# Altium PCB PCB.PcbDoc (part 2 of 4)
Units mm, origin at the board's own origin, x right, y up, seen from the top; angles counter-clockwise.
Board outline 38 x 42 mm, 4 copper layers (Top Layer, Inner GND 1, Inner GND 2, Bottom Layer), stack 1.62 mm thick; 195 components, 172 nets, 763 pads, 474 vias.
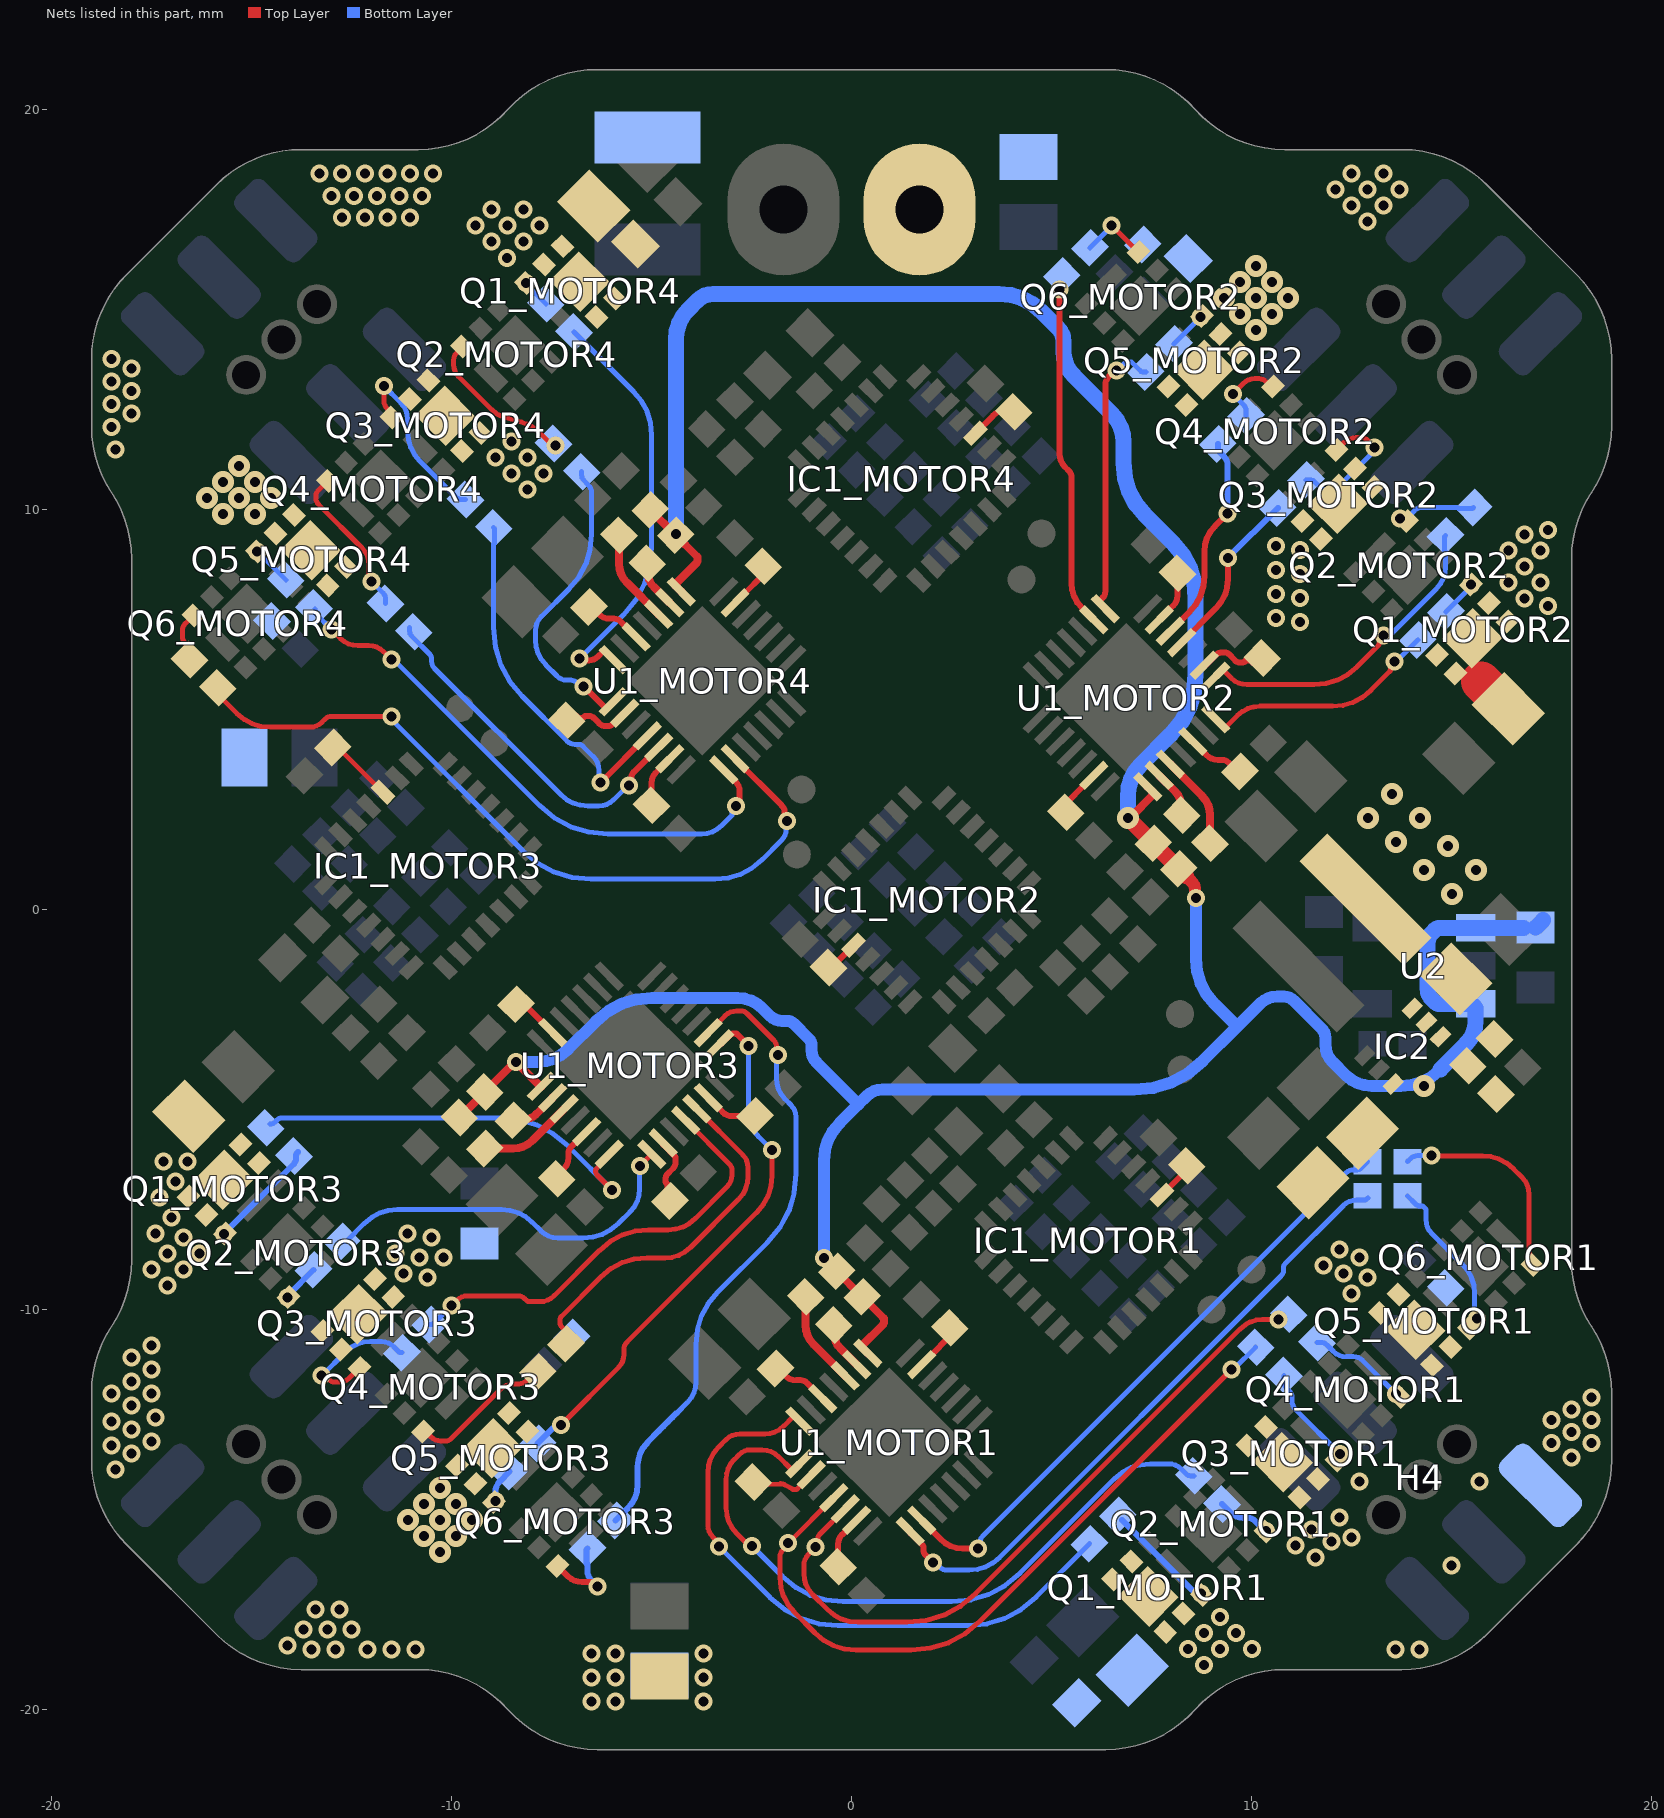
[diagram p4: the nets of this part, all layers, seen from the top]

## Via types
v1: diameter 0.45, hole 0.25, Top Layer to Bottom Layer, tented both sides, 381 vias
v2: diameter 0.55, hole 0.25, Top Layer to Bottom Layer, tented both sides, 93 vias

## Nets (pads, with @x,y where several pads share a name; then routed paths per layer and width w, separated by ;. In a path a pad name is that pad's centre, name@x,y a point inside that pad or via, vN(x,y) a via of type N, cw(c..) or ccw(c..) an arc to the next point about the centre after c; other vN are vias at no path point) (continued)
+5V: C3_MOTOR1.2 C3_MOTOR2.2 C3_MOTOR3.2 C3_MOTOR4.2 C4_MOTOR1.2 C4_MOTOR2.2 C4_MOTOR3.2 C4_MOTOR4.2 C17.2 C18.2 C19.2 IC2.6 R22.2 U1_MOTOR1.1 U1_MOTOR2.1 U1_MOTOR3.1 U1_MOTOR4.1 U2.1 U2.3 | length 83.6
  Top Layer w0.15: v1@8.599,0.301 v1(8.609,0.291)
  Top Layer w0.2: C3_MOTOR3.2@-9.805,-5.198 C4_MOTOR3.2@-9.177,-4.57 ; C4_MOTOR3.2@-9.169,-4.561 -8.424,-3.817 -8.42,-3.814 -8.415,-3.811 -8.41,-3.809 -8.405,-3.809 -8.397,-3.809 -8.394,-3.809 v1(-8.391,-3.809) -8.389,-3.811 -8.387,-3.813 -7.773,-4.427 -7.77,-4.429 -7.767,-4.43 -7.764,-4.429 -7.761,-4.427 U1_MOTOR3.1@-7.754,-4.42 ; C3_MOTOR4.2@-5.036,9.998 C4_MOTOR4.2@-4.411,9.373 ; C4_MOTOR4.2@-4.409,9.371 -4.408,9.37 C4_MOTOR4.2@-4.408,9.353 ; C4_MOTOR4.2@-4.399,9.361 -3.873,8.835 -3.863,8.824 -3.857,8.811 -3.852,8.797 -3.851,8.782 -3.851,8.745 -3.854,8.718 -3.861,8.693 -3.873,8.67 -3.891,8.649 -4.401,8.139 -4.404,8.135 -4.406,8.132 -4.407,8.128 -4.408,8.124 -4.408,8.113 -4.407,8.105 -4.405,8.098 -4.401,8.092 -4.396,8.086 U1_MOTOR4.1@-4.258,7.947 ; C3_MOTOR1.2@-0.371,-9.043 0.251,-9.665 0.253,-9.668 0.255,-9.671 0.256,-9.675 0.256,-9.678 C4_MOTOR1.2@0.256,-9.688 ; C4_MOTOR1.2@0.265,-9.679 0.791,-10.206 0.801,-10.217 0.808,-10.23 0.812,-10.243 0.813,-10.258 0.813,-10.296 0.811,-10.323 0.803,-10.347 0.791,-10.37 0.774,-10.391 0.263,-10.902 0.26,-10.905 0.258,-10.909 0.257,-10.913 0.256,-10.917 0.256,-10.928 0.257,-10.935 0.259,-10.942 0.263,-10.949 0.268,-10.955 U1_MOTOR1.1@0.406,-11.094 ; v2@6.997,2.328 7.542,2.873 7.547,2.879 7.551,2.886 7.553,2.893 7.554,2.901 7.554,2.911 7.553,2.916 7.552,2.919 7.55,2.923 7.547,2.926 U1_MOTOR2.1@7.404,3.07 ; C4_MOTOR2.2@7.554,1.655 C4_MOTOR2.2@7.554,1.665
  Top Layer w0.3: C3_MOTOR2.2@8.366,0.835 8.499,0.702 8.539,0.653 8.568,0.6 8.585,0.542 8.591,0.479 8.591,0.32 8.592,0.315 8.593,0.31 8.596,0.305 v1@8.599,0.301
  Top Layer w0.4: v2@6.997,2.204 C4_MOTOR2.2@7.545,1.656 ; C4_MOTOR2.2@7.554,1.655 7.554,1.651 7.555,1.648 7.557,1.645 7.559,1.642 7.997,1.204 8.089,1.112 C3_MOTOR2.2@8.181,1.019 8.274,0.927 C3_MOTOR2.2@8.366,0.835
  Bottom Layer w0.3: v1(-8.391,-3.809) -7.85,-3.809 -7.636,-3.789 -7.439,-3.731 -7.258,-3.633 -7.093,-3.496 -6.387,-2.789 -6.082,-2.536 -5.748,-2.355 -5.384,-2.247 -4.991,-2.211 -2.852,-2.211 -2.677,-2.227 -2.516,-2.275 -2.368,-2.355 -2.233,-2.467 -2.047,-2.653 -1.98,-2.708 -1.907,-2.748 -1.827,-2.772 -1.74,-2.78 -1.619,-2.78 -1.571,-2.784 -1.527,-2.797 -1.487,-2.819 -1.45,-2.85 -1.07,-3.23 -1.039,-3.267 -1.018,-3.307 -1.004,-3.351 -1,-3.399 -1,-3.52 -0.992,-3.607 -0.968,-3.687 -0.928,-3.76 -0.873,-3.827 0.17,-4.87 ; v1(-0.691,-8.709) -0.691,-6.279 -0.667,-6.015 -0.594,-5.771 -0.473,-5.547 -0.304,-5.343 0.17,-4.87 ; v1(8.609,0.291) 8.609,-1.236 8.638,-1.552 8.725,-1.844 8.87,-2.112 9.073,-2.357 9.64,-2.924 ; 14.724,-3.994 14.506,-4.176 14.266,-4.305 14.005,-4.383 13.723,-4.409 13.006,-4.409 12.822,-4.392 12.652,-4.341 12.496,-4.257 12.354,-4.139 12.024,-3.809 11.945,-3.715 11.889,-3.611 11.856,-3.499 11.845,-3.377 11.845,-3.206 11.838,-3.139 11.82,-3.077 11.789,-3.021 11.746,-2.969 11.05,-2.273 10.999,-2.23 10.942,-2.199 10.88,-2.181 10.813,-2.174 10.642,-2.174 10.521,-2.186 10.408,-2.219 10.305,-2.275 10.21,-2.353 9.64,-2.924 ; 0.17,-4.87 0.373,-4.666 0.461,-4.594 0.557,-4.542 0.662,-4.51 0.775,-4.5 7.064,-4.5 7.546,-4.456 7.991,-4.323 8.399,-4.102 8.771,-3.793 9.64,-2.924
  Bottom Layer w0.4: v2(-4.391,9.391) -4.391,14.246 -4.371,14.46 -4.312,14.658 -4.214,14.84 -4.076,15.006 -3.864,15.218 -3.773,15.294 -3.673,15.348 -3.564,15.38 -3.446,15.391 3.678,15.391 3.982,15.363 4.263,15.28 4.52,15.14 4.755,14.945 5.16,14.54 5.221,14.466 5.265,14.386 5.291,14.297 5.3,14.202 5.3,13.96 5.316,13.787 5.364,13.626 5.443,13.479 5.555,13.345 6.502,12.398 6.633,12.241 6.726,12.069 6.781,11.882 6.8,11.679 6.8,11.165 6.834,10.797 6.935,10.456 7.104,10.144 7.341,9.859 8.035,9.165 8.283,8.867 8.46,8.539 8.567,8.182 8.602,7.795 8.602,5.868 8.564,5.448 8.448,5.059 8.255,4.703 7.985,4.378 7.231,3.624 7.09,3.455 6.989,3.269 6.929,3.066 6.909,2.847 v2(6.909,2.291) ; 14.724,-3.994 15.364,-3.354 15.469,-3.228 15.544,-3.089 15.589,-2.938 15.604,-2.774 15.604,-2.546 15.592,-2.464 15.557,-2.406 15.499,-2.371 15.417,-2.359 14.716,-2.359 14.677,-2.355 14.64,-2.344 14.607,-2.326 14.576,-2.301 14.505,-2.23 14.459,-2.175 14.426,-2.114 14.407,-2.047 14.4,-1.976 14.4,-0.842 14.407,-0.771 14.426,-0.704 14.459,-0.643 14.505,-0.588 14.576,-0.517 14.607,-0.492 14.64,-0.473 14.677,-0.463 14.716,-0.459 15.6,-0.459 15.602,-0.459 U2.1@15.604,-0.459 U2.1@15.604,-0.459 15.607,-0.462 U2.1@15.608,-0.463 ; U2.1@15.612,-0.465 C17.2@16.8,-0.465 ; C17.2@17.101,-0.45 C17.2@17.289,-0.262
  other v2: 14.309,-4.409
+VBAT: C10_MOTOR1.2 C10_MOTOR2.2 C10_MOTOR3.2 C10_MOTOR4.2 C11_MOTOR1.2 C11_MOTOR2.2 C11_MOTOR3.2 C11_MOTOR4.2 C12_MOTOR1.2 C12_MOTOR2.2 C12_MOTOR3.2 C12_MOTOR4.2 C13_MOTOR1.2 C13_MOTOR2.2 C13_MOTOR3.2 C13_MOTOR4.2 C15.2 C16.2 H1.2 H4.6 IC2.2 IC2.3 L1.2 Q1_MOTOR1.1 Q1_MOTOR1.2 Q1_MOTOR1.5 Q1_MOTOR1.6 Q1_MOTOR1.7 Q1_MOTOR2.1 Q1_MOTOR2.2 Q1_MOTOR2.5 Q1_MOTOR2.6 Q1_MOTOR2.7 Q1_MOTOR3.1 Q1_MOTOR3.2 Q1_MOTOR3.5 Q1_MOTOR3.6 Q1_MOTOR3.7 Q1_MOTOR4.1 Q1_MOTOR4.2 Q1_MOTOR4.5 Q1_MOTOR4.6 Q1_MOTOR4.7 Q3_MOTOR1.1 Q3_MOTOR1.2 Q3_MOTOR1.5 Q3_MOTOR1.6 Q3_MOTOR1.7 Q3_MOTOR2.1 Q3_MOTOR2.2 Q3_MOTOR2.5 Q3_MOTOR2.6 Q3_MOTOR2.7 Q3_MOTOR3.1 Q3_MOTOR3.2 Q3_MOTOR3.5 Q3_MOTOR3.6 Q3_MOTOR3.7 Q3_MOTOR4.1 Q3_MOTOR4.2 Q3_MOTOR4.5 Q3_MOTOR4.6 Q3_MOTOR4.7 Q5_MOTOR1.1 Q5_MOTOR1.2 Q5_MOTOR1.5 Q5_MOTOR1.6 Q5_MOTOR1.7 Q5_MOTOR2.1 Q5_MOTOR2.2 Q5_MOTOR2.5 Q5_MOTOR2.6 Q5_MOTOR2.7 Q5_MOTOR3.1 Q5_MOTOR3.2 Q5_MOTOR3.5 Q5_MOTOR3.6 Q5_MOTOR3.7 Q5_MOTOR4.1 Q5_MOTOR4.2 Q5_MOTOR4.5 Q5_MOTOR4.6 Q5_MOTOR4.7 | length 1
  Top Layer w1: 15.737,5.7 C10_MOTOR2.2@16.419,5.019
  other v1: -6.5,-19.8 -5.9,-19.8 -3.7,-19.8 -6.5,-19.2 -5.9,-19.2 -3.7,-19.2 8.81,-18.884 -6.5,-18.6 -5.9,-18.6 -3.7,-18.6 -13.5,-18.5 -12.9,-18.5 -12.1,-18.5 -11.5,-18.5 -10.9,-18.5 8.41,-18.484 9.21,-18.484 10.01,-18.484 13.6,-18.5 14.2,-18.5 -14.1,-18.4 8.81,-18.084 9.61,-18.084 -13.7,-18 -13.1,-18 -12.5,-18 9.21,-17.684 -13.4,-17.5 -12.8,-17.5 15,-16.4 11.6,-16.2 11.1,-15.9 12,-15.8 12.5,-15.7 11.5,-15.5 12.2,-15.2 12.7,-14.3 15.7,-14.3 -18.4,-14 18,-13.7 -18,-13.6 -18.5,-13.4 17.5,-13.331 18.5,-13.331 -17.5,-13.3 18,-13.066 -18,-13 -18.5,-12.8 17.5,-12.766 18.5,-12.766 -17.4,-12.7 18,-12.5 -18,-12.4 18.5,-12.2 -18.5,-12.1 -17.5,-12.1 -18,-11.8 -17.5,-11.5 -18,-11.2 -17.5,-10.9 12.5,-9.6 -17.1,-9.4 -10.6,-9.2 12.9,-9.2 -11.2,-9.1 12.3,-9.1 -17.5,-9 -16.7,-9 11.8,-8.9 -10.8,-8.7 -10.2,-8.7 12.7,-8.7 -17.1,-8.6 -16.3,-8.6 -11.4,-8.6 12.2,-8.5 -16.7,-8.2 -10.5,-8.2 -17.4,-8.1 -11.1,-8.1 -17,-7.7 -17.3,-7.2 -16.9,-6.8 -17.2,-6.3 -16.6,-6.3 11.209,7.191 10.609,7.291 17.409,7.591 16.826,7.773 11.209,7.791 10.609,7.891 16.426,8.173 17.226,8.173 11.209,8.391 10.609,8.491 16.826,8.573 16.426,8.973 17.226,8.973 11.209,8.991 10.609,9.091 16.826,9.373 17.409,9.491 -8.1,10.5 -8.5,10.9 -7.7,10.9 -8.9,11.3 -8.1,11.3 -18.4,11.5 -8.5,11.7 -18.5,12.069 -18,12.4 -18.5,12.634 -18,12.966 -18.5,13.2 -18,13.531 -18.5,13.766 -8.609,16.291 -9,16.7 -8.2,16.7 -9.4,17.1 -8.6,17.1 -7.8,17.1 12.9,17.2 -12.734,17.3 -12.166,17.3 -11.6,17.3 -11.034,17.3 -9,17.5 -8.2,17.5 12.5,17.6 13.3,17.6 -13,17.834 -12.434,17.834 -11.866,17.834 -11.3,17.834 -10.734,17.834 12.1,18 12.9,18 13.7,18 -13.3,18.4 -12.734,18.4 -12.166,18.4 -11.6,18.4 -11.034,18.4 -10.469,18.4 12.5,18.4 13.3,18.4
  other v2: -10.29,-16.062 -10.69,-15.662 -9.89,-15.662 -11.09,-15.262 -10.29,-15.262 -9.49,-15.262 -10.69,-14.862 -9.89,-14.862 -10.29,-14.462 15.009,0.391 14.309,0.991 15.609,0.991 14.909,1.591 13.609,1.691 12.909,2.291 14.209,2.291 13.509,2.891 -15.709,9.891 -14.909,9.891 -16.109,10.291 -15.309,10.291 -14.509,10.291 -15.709,10.691 -14.909,10.691 -15.309,11.091 10.109,14.491 9.709,14.891 10.509,14.891 9.309,15.291 10.109,15.291 10.909,15.291 9.709,15.691 10.509,15.691 10.109,16.091
BSTA_MOTOR1: C5_MOTOR1.2 U1_MOTOR1.5 | length 1.5
  Top Layer w0.15: C5_MOTOR1.2@-1.901,-11.476 -1.866,-11.476 -1.852,-11.477 -1.839,-11.481 -1.827,-11.487 -1.817,-11.496 -1.661,-11.651 -1.601,-11.702 -1.534,-11.738 -1.461,-11.76 -1.383,-11.767 -1.273,-11.767 -1.229,-11.771 -1.189,-11.783 -1.153,-11.803 -1.119,-11.83 U1_MOTOR1.5@-0.725,-12.225
BSTA_MOTOR2: C5_MOTOR2.2 U1_MOTOR2.5 | length 1.5
  Top Layer w0.15: U1_MOTOR2.5@8.535,4.201 8.877,3.859 8.938,3.808 9.005,3.772 9.078,3.751 9.156,3.744 9.266,3.744 9.309,3.74 9.349,3.728 9.386,3.708 9.42,3.68 9.627,3.473 9.637,3.464 9.649,3.457 9.662,3.454 9.676,3.452 C5_MOTOR2.2@9.711,3.452
BSTA_MOTOR3: C5_MOTOR3.2 U1_MOTOR3.5 | length 1.5
  Top Layer w0.15: C5_MOTOR3.2@-7.372,-6.728 -7.372,-6.692 -7.371,-6.679 -7.367,-6.666 -7.361,-6.654 -7.352,-6.643 -7.197,-6.488 -7.146,-6.427 -7.11,-6.36 -7.088,-6.288 -7.081,-6.209 -7.081,-6.099 -7.077,-6.056 -7.065,-6.016 -7.045,-5.979 -7.018,-5.946 U1_MOTOR3.5@-6.623,-5.551
BSTA_MOTOR4: C5_MOTOR4.2 U1_MOTOR4.5 | length 1.5
  Top Layer w0.15: C5_MOTOR4.2@-6.565,7.565 -6.53,7.565 -6.516,7.564 -6.503,7.56 -6.492,7.553 -6.481,7.544 -6.326,7.389 -6.265,7.339 -6.198,7.303 -6.125,7.281 -6.047,7.274 -5.937,7.274 -5.894,7.27 -5.854,7.258 -5.817,7.238 -5.784,7.21 U1_MOTOR4.5@-5.389,6.816
BSTB_MOTOR1: C8_MOTOR1.2 U1_MOTOR1.9 | length 1.7
  Top Layer w0.125: C8_MOTOR1.2@-2.457,-14.311 ccw(c-2.275,-14.128) -2.275,-14.387 -2.116,-14.376 -1.784,-14.355 cw(c-1.771,-14.544) -1.771,-14.355 cw(c-1.771,-14.544) -1.679,-14.379 -1.665,-14.387 -1.485,-14.485 ccw(c-1.425,-14.375) -1.425,-14.5 -1.4,-14.5 ccw(c-1.4,-14.436) -1.355,-14.481 U1_MOTOR1.9@-1.008,-14.134
BSTB_MOTOR2: C8_MOTOR2.2 U1_MOTOR2.9 | length 1.8
  Top Layer w0.15: U1_MOTOR2.9@8.818,6.111 8.837,6.111 8.845,6.111 8.852,6.113 8.858,6.117 8.864,6.122 9.102,6.36 9.139,6.39 9.178,6.412 9.222,6.425 9.269,6.429 9.334,6.429 9.36,6.426 9.384,6.419 9.406,6.408 9.426,6.391 9.586,6.231 9.614,6.207 9.645,6.191 9.678,6.181 9.715,6.177 9.775,6.177 9.79,6.179 9.804,6.183 9.817,6.19 9.829,6.2 9.844,6.215 9.851,6.22 9.858,6.224 9.866,6.227 9.874,6.227 9.933,6.227 9.956,6.225 9.977,6.219 9.997,6.208 10.015,6.193 10.041,6.167 10.052,6.158 10.065,6.151 10.078,6.147 10.092,6.146 C8_MOTOR2.2@10.409,6.146
BSTB_MOTOR3: C8_MOTOR3.2 U1_MOTOR3.9 | length 1.8
  Top Layer w0.15: U1_MOTOR3.9@-4.714,-5.834 -4.714,-5.854 -4.713,-5.861 -4.711,-5.868 -4.708,-5.875 -4.703,-5.881 -4.434,-6.15 -4.417,-6.17 -4.405,-6.192 -4.398,-6.216 -4.396,-6.241 -4.396,-6.307 -4.4,-6.354 -4.413,-6.397 -4.434,-6.437 -4.465,-6.473 -4.604,-6.613 -4.623,-6.635 -4.636,-6.66 -4.644,-6.687 -4.647,-6.717 -4.647,-6.791 -4.646,-6.807 -4.642,-6.821 -4.635,-6.834 -4.625,-6.846 -4.61,-6.861 -4.604,-6.867 -4.6,-6.874 -4.598,-6.882 -4.597,-6.891 -4.597,-6.969 -4.598,-6.983 -4.602,-6.995 -4.608,-7.007 -4.617,-7.017 -4.642,-7.042 -4.658,-7.061 -4.669,-7.083 -4.676,-7.106 -4.679,-7.131 C8_MOTOR3.2@-4.679,-7.425
BSTB_MOTOR4: C8_MOTOR4.2 U1_MOTOR4.9 | length 1.8
  Top Layer w0.15: C8_MOTOR4.2@-7.263,4.871 -6.968,4.871 -6.943,4.869 -6.92,4.862 -6.899,4.851 -6.88,4.834 -6.855,4.81 -6.845,4.801 -6.833,4.795 -6.82,4.791 -6.807,4.79 -6.743,4.79 -6.727,4.791 -6.713,4.795 -6.7,4.802 -6.688,4.812 -6.673,4.827 -6.667,4.833 -6.659,4.837 -6.652,4.839 -6.643,4.84 -6.561,4.84 -6.528,4.837 -6.498,4.828 -6.471,4.813 -6.446,4.792 -6.311,4.657 -6.275,4.627 -6.235,4.606 -6.191,4.593 -6.144,4.588 -6.079,4.588 -6.053,4.591 -6.029,4.598 -6.008,4.61 -5.988,4.626 -5.719,4.895 -5.713,4.9 -5.706,4.904 -5.699,4.906 -5.691,4.906 U1_MOTOR4.9@-5.672,4.906
BSTC_MOTOR1: C14_MOTOR1.2 U1_MOTOR1.13 | length 1.4
  Top Layer w0.15: C14_MOTOR1.2@-0.336,-16.432 -0.348,-16.421 -0.352,-16.415 -0.355,-16.41 -0.357,-16.404 -0.357,-16.397 -0.357,-16.078 -0.357,-16.072 -0.355,-16.066 -0.352,-16.06 -0.348,-16.055 -0.341,-16.049 -0.339,-16.046 -0.337,-16.043 -0.336,-16.039 -0.336,-16.036 -0.336,-15.865 -0.33,-15.798 -0.311,-15.735 -0.28,-15.678 -0.237,-15.626 U1_MOTOR1.13@0.124,-15.265
BSTC_MOTOR2: C14_MOTOR2.2 U1_MOTOR2.13 | length 1.4
  Top Layer w0.15: U1_MOTOR2.13@7.686,7.242 8.045,7.6 8.089,7.654 8.121,7.712 8.14,7.776 8.146,7.845 8.146,8.006 8.147,8.013 8.148,8.019 8.151,8.024 8.156,8.029 8.162,8.036 8.164,8.039 8.166,8.042 8.167,8.045 8.167,8.049 8.167,8.374 8.167,8.381 8.165,8.387 8.162,8.392 8.158,8.397 C14_MOTOR2.2@8.146,8.409
BSTC_MOTOR3: C14_MOTOR3.2 U1_MOTOR3.13 | length 1.4
  Top Layer w0.15: U1_MOTOR3.13@-3.583,-4.703 -3.224,-5.061 -3.171,-5.106 -3.112,-5.137 -3.049,-5.156 -2.98,-5.162 -2.818,-5.162 -2.812,-5.163 -2.806,-5.165 -2.8,-5.168 -2.795,-5.172 -2.789,-5.178 -2.786,-5.181 -2.783,-5.182 -2.78,-5.183 -2.776,-5.184 -2.451,-5.184 -2.444,-5.183 -2.438,-5.181 -2.432,-5.178 -2.427,-5.174 C14_MOTOR3.2@-2.416,-5.162
BSTC_MOTOR4: C14_MOTOR4.2 U1_MOTOR4.13 | length 1.4
  Top Layer w0.15: C14_MOTOR4.2@-5,2.608 -5.012,2.62 -5.016,2.625 -5.019,2.631 -5.021,2.637 -5.021,2.643 -5.021,2.963 -5.021,2.969 -5.019,2.975 -5.016,2.981 -5.012,2.986 -5.005,2.992 -5.003,2.995 -5.001,2.998 -5,3.001 -5,3.005 -5,3.176 -4.994,3.243 -4.975,3.305 -4.945,3.362 -4.901,3.414 U1_MOTOR4.13@-4.541,3.775
CPA_MOTOR1: C6_MOTOR1.1 U1_MOTOR1.2 | length 1.2
  Top Layer w0.2: C6_MOTOR1.1@-0.442,-10.386 -0.43,-10.398 -0.426,-10.403 -0.423,-10.409 -0.421,-10.415 -0.421,-10.421 -0.421,-10.647 -0.413,-10.736 -0.388,-10.818 -0.347,-10.894 -0.29,-10.963 U1_MOTOR1.2@0.124,-11.376
CPA_MOTOR2: C6_MOTOR2.1 U1_MOTOR2.2 | length 1.2
  Top Layer w0.2: U1_MOTOR2.2@7.686,3.353 8.096,2.943 8.155,2.872 8.197,2.794 8.222,2.71 8.231,2.618 8.231,2.398 8.231,2.391 8.233,2.385 8.236,2.38 8.24,2.375 C6_MOTOR2.1@8.252,2.363
CPA_MOTOR3: C6_MOTOR3.1 U1_MOTOR3.2 | length 1.2
  Top Layer w0.2: C6_MOTOR3.1@-8.462,-5.269 -8.45,-5.257 -8.445,-5.253 -8.439,-5.25 -8.433,-5.248 -8.427,-5.247 -8.201,-5.247 -8.112,-5.239 -8.03,-5.215 -7.954,-5.174 -7.885,-5.117 U1_MOTOR3.2@-7.472,-4.703
CPA_MOTOR4: C6_MOTOR4.1 U1_MOTOR4.2 | length 1.2
  Top Layer w0.2: C6_MOTOR4.1@-5.106,8.654 -5.095,8.642 -5.09,8.637 -5.087,8.632 -5.086,8.626 -5.085,8.619 -5.085,8.394 -5.077,8.304 -5.052,8.222 -5.011,8.147 -4.954,8.078 U1_MOTOR4.2@-4.541,7.664
CPB_MOTOR1: C6_MOTOR1.2 U1_MOTOR1.3 | length 2.4
  Top Layer w0.2: C6_MOTOR1.2@-1.149,-9.679 -1.138,-9.691 -1.133,-9.696 -1.13,-9.702 -1.129,-9.708 -1.128,-9.714 -1.128,-10.004 -1.128,-10.008 -1.129,-10.011 -1.131,-10.014 -1.133,-10.017 -1.14,-10.023 -1.144,-10.028 -1.147,-10.034 -1.149,-10.04 -1.149,-10.046 -1.149,-10.389 -1.137,-10.524 -1.1,-10.649 -1.038,-10.763 -0.951,-10.868 U1_MOTOR1.3@-0.159,-11.659
CPB_MOTOR2: C6_MOTOR2.2 U1_MOTOR2.3 | length 2.4
  Top Layer w0.2: U1_MOTOR2.3@7.969,3.636 8.757,2.848 8.845,2.742 8.909,2.625 8.947,2.497 8.959,2.359 8.959,2.017 8.959,2.013 8.958,2.01 8.956,2.007 8.954,2.004 8.948,1.998 8.943,1.993 8.94,1.987 8.939,1.981 8.938,1.975 8.938,1.691 8.939,1.684 8.94,1.678 8.943,1.673 8.948,1.668 C6_MOTOR2.2@8.959,1.656
CPB_MOTOR3: C6_MOTOR3.2 U1_MOTOR3.3 | length 2.4
  Top Layer w0.2: C6_MOTOR3.2@-9.169,-5.976 -9.157,-5.964 -9.152,-5.96 -9.146,-5.957 -9.14,-5.955 -9.134,-5.954 -8.85,-5.954 -8.843,-5.955 -8.837,-5.957 -8.832,-5.96 -8.827,-5.964 -8.82,-5.97 -8.818,-5.973 -8.815,-5.974 -8.811,-5.975 -8.808,-5.976 -8.462,-5.976 -8.325,-5.963 -8.199,-5.926 -8.084,-5.863 -7.979,-5.775 U1_MOTOR3.3@-7.189,-4.986
CPB_MOTOR4: C6_MOTOR4.2 U1_MOTOR4.3 | length 2.4
  Top Layer w0.2: C6_MOTOR4.2@-5.813,9.361 -5.802,9.35 -5.797,9.345 -5.795,9.339 -5.793,9.333 -5.792,9.327 -5.792,9.036 -5.792,9.033 -5.793,9.029 -5.795,9.026 -5.797,9.024 -5.804,9.017 -5.808,9.012 -5.811,9.007 -5.813,9.001 -5.813,8.994 -5.813,8.652 -5.801,8.517 -5.764,8.392 -5.702,8.277 -5.615,8.173 U1_MOTOR4.3@-4.823,7.381
DSHOT_PIN_MOTOR1: IC1_MOTOR1.24 R4_MOTOR1.1 | length 1
  Top Layer w0.15: IC1_MOTOR1.24@7.76,-7.134 8.347,-6.547 8.362,-6.529 8.373,-6.509 8.379,-6.487 8.382,-6.464 R4_MOTOR1.1@8.382,-6.404
DSHOT_PIN_MOTOR2: IC1_MOTOR2.24 R4_MOTOR2.1 | length 1
  Top Layer w0.15: R4_MOTOR2.1@-0.572,-1.619 -0.572,-1.56 -0.569,-1.536 -0.563,-1.514 -0.552,-1.495 -0.537,-1.476 IC1_MOTOR2.24@0.05,-0.89
DSHOT_PIN_MOTOR3: IC1_MOTOR3.24 R4_MOTOR3.1 | length 1.7
  Top Layer w0.125: R4_MOTOR3.1@-12.971,4.054 -12.898,4.054 -12.869,4.051 -12.842,4.043 -12.817,4.03 -12.795,4.011 IC1_MOTOR3.24@-11.718,2.934
DSHOT_PIN_MOTOR4: IC1_MOTOR4.24 R4_MOTOR4.1 | length 1.2
  Top Layer w0.15: IC1_MOTOR4.24@3.096,11.907 3.538,12.348 3.6,12.4 3.669,12.438 3.745,12.46 3.826,12.468 4.019,12.468 4.025,12.467 4.031,12.465 4.037,12.462 4.042,12.458 R4_MOTOR4.1@4.054,12.446
DT_MOTOR1: R2_MOTOR1.2 U1_MOTOR1.27 | length 1.3
  Top Layer w0.15: U1_MOTOR1.27@1.75,-11.376 R2_MOTOR1.2@2.669,-10.457
DT_MOTOR2: R2_MOTOR2.2 U1_MOTOR2.27 | length 1.3
  Top Layer w0.15: R2_MOTOR2.2@5.141,2.434 U1_MOTOR2.27@6.06,3.353
DT_MOTOR3: R2_MOTOR3.2 U1_MOTOR3.27 | length 1.3
  Top Layer w0.15: R2_MOTOR3.2@-8.391,-2.157 U1_MOTOR3.27@-7.472,-3.076
DT_MOTOR4: R2_MOTOR4.2 U1_MOTOR4.27 | length 1.3
  Top Layer w0.15: U1_MOTOR4.27@-2.914,7.664 R2_MOTOR4.2@-1.995,8.583
FB: IC2.1 R22.1 R23.2
GHA_MOTOR1: R1_MOTOR1.1 U1_MOTOR1.7 | length 15.7
  Top Layer w0.125: v1(-3.308,-15.926) -3.308,-15.881 -3.31,-15.864 -3.315,-15.848 -3.323,-15.833 -3.334,-15.819 -3.464,-15.689 -3.519,-15.622 -3.559,-15.549 -3.583,-15.469 -3.591,-15.382 -3.591,-14.082 -3.574,-13.9 -3.524,-13.731 -3.441,-13.577 -3.323,-13.436 -3.144,-13.256 -3.066,-13.192 -2.981,-13.146 -2.889,-13.118 -2.788,-13.109 -2.166,-13.109 -2.034,-13.097 -1.911,-13.06 -1.799,-12.999 -1.696,-12.914 -1.475,-12.693 -1.466,-12.686 -1.456,-12.68 -1.446,-12.677 -1.434,-12.676 -1.418,-12.676 -1.412,-12.677 -1.406,-12.678 -1.401,-12.681 -1.396,-12.685 U1_MOTOR1.7@-1.291,-12.791
  Bottom Layer w0.125: v1(-3.308,-15.926) -2.041,-17.193 -1.669,-17.502 -1.261,-17.723 -0.816,-17.856 -0.334,-17.9 2.9,-17.9 3.382,-17.856 3.827,-17.723 4.235,-17.502 4.607,-17.193 R1_MOTOR1.1@5.946,-15.854
GHA_MOTOR2: R1_MOTOR2.1 U1_MOTOR2.7 | length 6
  Top Layer w0.125: U1_MOTOR2.7@9.101,4.767 9.303,4.565 9.309,4.56 9.315,4.557 9.322,4.555 9.33,4.554 9.341,4.554 9.345,4.554 9.349,4.555 9.352,4.557 9.356,4.56 9.643,4.848 9.767,4.95 9.903,5.024 10.051,5.068 10.211,5.083 12.018,5.083 12.29,5.108 12.541,5.183 12.772,5.307 12.982,5.482 13.457,5.957 13.463,5.964 13.466,5.971 13.469,5.979 13.47,5.987 13.47,5.999 13.47,6.004 13.471,6.008 13.473,6.012 13.477,6.016 13.545,6.084 13.557,6.099 13.566,6.115 13.571,6.133 13.573,6.152 v1(13.573,6.2)
  Bottom Layer w0.125: v1(13.573,6.2) 13.598,6.2 13.607,6.201 13.616,6.204 13.625,6.208 13.632,6.214 R1_MOTOR2.1@14.155,6.737
GHA_MOTOR3: R1_MOTOR3.1 U1_MOTOR3.7 | length 10.4
  Top Layer w0.125: U1_MOTOR3.7@-6.057,-6.117 -6.057,-6.14 -6.058,-6.149 -6.061,-6.158 -6.065,-6.165 -6.071,-6.172 -6.379,-6.481 -6.387,-6.49 -6.393,-6.501 -6.396,-6.512 -6.397,-6.525 -6.397,-6.556 -6.395,-6.578 -6.389,-6.599 -6.379,-6.618 -6.364,-6.636 v1(-5.991,-7.009)
  Bottom Layer w0.125: R1_MOTOR3.1@-14.545,-5.355 -14.496,-5.355 -14.477,-5.354 -14.46,-5.348 -14.443,-5.34 -14.429,-5.327 -14.363,-5.262 -14.335,-5.239 -14.305,-5.222 -14.271,-5.212 -14.235,-5.209 -8.791,-5.209 -8.309,-5.253 -7.864,-5.386 -7.456,-5.607 -7.084,-5.916 v1(-5.991,-7.009)
GHA_MOTOR4: R1_MOTOR4.1 U1_MOTOR4.7 | length 10.6
  Top Layer w0.15: v1(-6.797,6.275) -6.773,6.252 -6.763,6.243 -6.752,6.237 -6.74,6.233 -6.726,6.232 -6.566,6.232 -6.503,6.238 -6.444,6.255 -6.391,6.284 -6.342,6.325 -6.215,6.452 -6.209,6.457 -6.202,6.461 -6.195,6.463 -6.188,6.463 -6.177,6.463 -6.173,6.463 -6.169,6.462 -6.165,6.46 -6.162,6.457 U1_MOTOR4.7@-5.955,6.25
  Bottom Layer w0.125: R1_MOTOR4.1@-6.937,14.437 -6,13.5 -5.45,12.95 -5.253,12.713 -5.113,12.453 -5.028,12.17 -5,11.864 -5,9.072 -5.044,8.59 -5.177,8.145 -5.398,7.737 -5.707,7.365 v1(-6.797,6.275)
GHAG_MOTOR1: Q1_MOTOR1.3 R1_MOTOR1.2 | length 2.7
  Bottom Layer w0.15: R1_MOTOR1.2@6.763,-15.263 8.493,-16.993 8.517,-17.013 8.543,-17.027 8.571,-17.035 8.602,-17.038 8.645,-17.038 8.662,-17.04 8.678,-17.044 8.692,-17.052 8.705,-17.063 v1(8.738,-17.096)
GHAG_MOTOR2: Q1_MOTOR2.3 R1_MOTOR2.2 | length 0.9
  Bottom Layer w0.125: R1_MOTOR2.2@14.863,7.445 15.462,8.044 15.47,8.054 15.477,8.066 15.48,8.078 15.481,8.091 v1(15.481,8.125)
GHAG_MOTOR3: Q1_MOTOR3.3 R1_MOTOR3.2 | length 2.8
  Bottom Layer w0.15: v1(-15.691,-8.109) -13.952,-6.37 -13.926,-6.338 -13.906,-6.303 -13.895,-6.264 -13.891,-6.222 -13.891,-6.15 -13.889,-6.134 -13.885,-6.119 -13.877,-6.105 -13.867,-6.092 R1_MOTOR3.2@-13.837,-6.063
GHAG_MOTOR4: Q1_MOTOR4.3 R1_MOTOR4.2 | length 0.7
  Bottom Layer w0.125: v1(-8.143,15.664) -8.143,15.652 -8.143,15.648 -8.141,15.644 -8.139,15.64 -8.137,15.637 R1_MOTOR4.2@-7.645,15.145
GHB_MOTOR1: R6_MOTOR1.1 U1_MOTOR1.11 | length 18.4
  Top Layer w0.125: v1@-1.586,-15.842 -1.589,-15.842 -1.591,-15.842 v1(-1.594,-15.842) -1.594,-15.844 -1.594,-15.846 -1.594,-15.863 -1.595,-15.871 -1.597,-15.879 -1.601,-15.886 -1.606,-15.892 -1.702,-15.989 -1.741,-16.035 -1.769,-16.086 -1.785,-16.142 -1.791,-16.203 -1.791,-16.7 -1.768,-16.945 -1.701,-17.172 -1.588,-17.38 -1.431,-17.569 -0.914,-18.086 -0.692,-18.271 -0.447,-18.403 -0.181,-18.483 0.107,-18.509 1.491,-18.509 1.973,-18.465 2.418,-18.332 2.826,-18.111 3.198,-17.802 v1(9.5,-11.5) ; v1@-1.582,-15.84 U1_MOTOR1.11@-0.442,-14.7
  Bottom Layer w0.125: v1(9.5,-11.5) 9.524,-11.5 9.533,-11.499 9.542,-11.497 9.55,-11.492 9.557,-11.486 R6_MOTOR1.1@10.104,-10.939
GHB_MOTOR2: R6_MOTOR2.1 U1_MOTOR2.11 | length 4.3
  Top Layer w0.15: U1_MOTOR2.11@8.252,6.676 9.104,7.528 9.238,7.689 9.333,7.865 9.39,8.057 9.409,8.264 v1(9.409,8.791)
  Bottom Layer w0.15: v1(9.409,8.791) R6_MOTOR2.1@10.655,10.037
GHB_MOTOR3: R6_MOTOR3.1 U1_MOTOR3.11 | length 11
  Top Layer w0.125: v1(-10,-9.9) -9.867,-9.767 -9.81,-9.72 -9.747,-9.686 -9.679,-9.665 -9.605,-9.659 -8.333,-9.659 -8.289,-9.663 -8.248,-9.675 -8.211,-9.695 -8.177,-9.723 -8.134,-9.766 -8.115,-9.782 -8.094,-9.793 -8.072,-9.8 -8.048,-9.802 -7.793,-9.802 -7.692,-9.793 -7.599,-9.765 -7.514,-9.719 -7.436,-9.654 -6.3,-8.518 -6.032,-8.295 -5.738,-8.136 -5.418,-8.041 -5.071,-8.009 -4.587,-8.009 -4.396,-7.991 -4.22,-7.939 -4.058,-7.851 -3.911,-7.729 -3.113,-6.931 -3.06,-6.867 -3.021,-6.796 -2.999,-6.72 -2.991,-6.637 -2.991,-6.521 -2.995,-6.475 -3.008,-6.433 -3.029,-6.394 -3.058,-6.359 U1_MOTOR3.11@-4.148,-5.269
  Bottom Layer w0.125: R6_MOTOR3.1@-10.534,-10.372 -10.5,-10.372 -10.487,-10.371 -10.474,-10.367 -10.463,-10.361 -10.452,-10.352 v1(-10,-9.9)
GHB_MOTOR4: R6_MOTOR4.1 U1_MOTOR4.11 | length 9.1
  Top Layer w0.15: v1(-6.279,3.179) -6.273,3.179 -6.271,3.179 -6.269,3.179 -6.267,3.18 -6.265,3.182 U1_MOTOR4.11@-5.106,4.341
  Bottom Layer w0.125: R6_MOTOR4.1@-8.946,9.546 -8.935,9.535 -8.931,9.53 -8.928,9.524 -8.926,9.518 -8.925,9.512 -8.925,9.168 -8.926,9.165 -8.927,9.162 -8.928,9.159 -8.93,9.156 -8.937,9.149 -8.941,9.144 -8.944,9.139 -8.946,9.133 -8.946,9.126 -8.946,7.046 -8.902,6.565 -8.77,6.12 -8.549,5.711 -8.239,5.339 -7.117,4.217 -7.073,4.18 -7.024,4.154 -6.971,4.138 -6.913,4.133 -6.832,4.133 -6.801,4.13 -6.772,4.121 -6.745,4.106 -6.72,4.086 -6.455,3.82 -6.393,3.746 -6.349,3.665 -6.322,3.576 -6.313,3.48 -6.313,3.236 -6.312,3.225 -6.31,3.215 -6.305,3.206 -6.298,3.198 v1(-6.279,3.179)
GHBG_MOTOR1: Q3_MOTOR1.3 R6_MOTOR1.2 | length 2.5
  Bottom Layer w0.125: R6_MOTOR1.2@10.811,-11.646 10.811,-11.79 10.816,-11.846 10.832,-11.898 10.858,-11.946 10.894,-11.99 10.957,-12.053 10.98,-12.08 10.996,-12.11 11.006,-12.143 11.009,-12.178 11.009,-12.272 11.015,-12.338 11.033,-12.399 11.063,-12.455 11.106,-12.506 v1(12.209,-13.609)
GHBG_MOTOR2: Q3_MOTOR2.3 R6_MOTOR2.2 | length 3.4
  Top Layer w0.125: Q3_MOTOR2.3@12.123,11.484 12.313,11.674 12.379,11.729 12.452,11.769 12.531,11.792 12.616,11.8 12.736,11.8 12.783,11.796 12.826,11.783 12.866,11.761 12.903,11.731 13.067,11.566 13.068,11.565 13.069,11.564 13.069,11.563 13.069,11.561 v1(13.069,11.558)
  Bottom Layer w0.125: R6_MOTOR2.2@11.363,10.745 11.455,10.745 11.491,10.741 11.525,10.731 11.555,10.715 11.583,10.691 11.745,10.529 11.75,10.526 11.754,10.523 11.759,10.522 11.765,10.521 11.772,10.521 11.776,10.521 11.778,10.52 11.781,10.519 11.783,10.517 11.792,10.508 11.796,10.504 11.801,10.502 11.806,10.5 11.811,10.5 11.97,10.5 12.033,10.506 12.09,10.523 12.144,10.552 12.192,10.592 12.947,11.347 13.041,11.442 13.054,11.456 13.062,11.473 13.068,11.49 13.069,11.509 v1(13.069,11.558)
GHBG_MOTOR3: Q3_MOTOR3.3 R6_MOTOR3.2 | length 3.5
  Top Layer w0.125: v1(-13.246,-11.654) -13.201,-11.654 -13.183,-11.656 -13.167,-11.661 -13.152,-11.669 -13.139,-11.68 -13.068,-11.751 -13.037,-11.776 -13.004,-11.795 -12.967,-11.805 -12.928,-11.809 -12.779,-11.809 -12.72,-11.804 -12.666,-11.787 -12.616,-11.761 -12.571,-11.723 Q3_MOTOR3.3@-12.304,-11.455
  Bottom Layer w0.125: v1(-13.246,-11.654) -12.65,-11.059 -12.514,-10.946 -12.364,-10.865 -12.201,-10.816 -12.024,-10.8 -11.754,-10.8 -11.668,-10.808 -11.589,-10.831 -11.517,-10.871 -11.451,-10.926 -11.315,-11.061 -11.306,-11.069 -11.295,-11.075 -11.284,-11.078 -11.272,-11.079 R6_MOTOR3.2@-11.241,-11.079
GHBG_MOTOR4: Q3_MOTOR4.3 R6_MOTOR4.2 | length 4.6
  Top Layer w0.125: v1(-11.691,13.091) -11.691,12.719 -11.686,12.662 -11.67,12.608 -11.643,12.559 -11.606,12.514 -11.535,12.443 -11.521,12.426 -11.51,12.406 -11.504,12.385 -11.502,12.363 Q3_MOTOR4.3@-11.502,12.305
  Bottom Layer w0.125: v1(-11.691,13.091) -11.271,12.671 -11.196,12.581 -11.143,12.482 -11.111,12.374 -11.1,12.258 -11.1,11.962 -11.081,11.75 -11.022,11.554 -10.925,11.374 -10.789,11.21 -9.889,10.31 -9.859,10.286 -9.826,10.268 -9.79,10.257 -9.752,10.254 R6_MOTOR4.2@-9.654,10.254
GHC_MOTOR1: R8_MOTOR1.1 U1_MOTOR1.15 | length 15.8
  Top Layer w0.15: U1_MOTOR1.15@1.467,-15.548 1.467,-15.568 1.468,-15.575 1.47,-15.582 1.473,-15.589 1.478,-15.595 1.769,-15.886 1.783,-15.902 1.792,-15.92 1.798,-15.939 1.8,-15.96 1.8,-16.013 1.803,-16.05 1.814,-16.085 1.831,-16.117 1.856,-16.147 2.027,-16.319 2.029,-16.32 2.029,-16.321 2.03,-16.323 2.03,-16.325 v1(2.03,-16.329)
  Bottom Layer w0.125: v1(2.03,-16.329) 2.066,-16.329 2.08,-16.33 2.093,-16.334 2.104,-16.341 2.115,-16.35 2.205,-16.439 2.243,-16.471 2.286,-16.494 2.332,-16.508 2.382,-16.512 2.933,-16.512 3.15,-16.492 3.351,-16.433 3.535,-16.333 3.703,-16.193 10.735,-9.161 10.764,-9.127 10.784,-9.09 10.796,-9.049 10.8,-9.005 10.8,-8.943 10.802,-8.919 10.809,-8.897 10.82,-8.876 10.836,-8.857 12.296,-7.397 12.367,-7.338 12.445,-7.295 12.53,-7.27 12.623,-7.262 12.823,-7.262 12.839,-7.26 12.854,-7.256 12.868,-7.248 12.88,-7.238 R8_MOTOR1.1@12.909,-7.209
GHC_MOTOR2: R8_MOTOR2.1 U1_MOTOR2.15 | length 7.1
  Top Layer w0.15: U1_MOTOR2.15@6.343,7.525 6.204,7.664 6.199,7.67 6.196,7.676 6.194,7.683 6.193,7.691 6.193,7.701 6.193,7.706 6.194,7.71 6.196,7.713 6.199,7.716 6.278,7.795 6.307,7.83 6.327,7.867 6.339,7.908 6.343,7.952 6.343,13.095 6.35,13.167 6.369,13.234 6.403,13.295 6.449,13.351 6.567,13.469 6.573,13.474 6.58,13.478 6.588,13.48 6.597,13.481 v1(6.619,13.481)
  Bottom Layer w0.125: v1(6.619,13.481) 6.633,13.481 6.639,13.482 6.644,13.483 6.649,13.486 6.653,13.489 6.81,13.646 6.833,13.666 6.859,13.68 6.887,13.688 6.918,13.691 6.96,13.691 6.977,13.689 6.992,13.685 7.006,13.677 7.019,13.666 7.214,13.472 7.232,13.457 7.252,13.446 7.273,13.44 7.297,13.437 R8_MOTOR2.1@7.355,13.437
GHC_MOTOR3: R8_MOTOR3.1 U1_MOTOR3.15 | length 13.5
  Top Layer w0.125: v1(-7.263,-12.884) -5.824,-11.445 -5.766,-11.375 -5.724,-11.298 -5.699,-11.214 -5.691,-11.123 -5.691,-10.996 -5.686,-10.946 -5.673,-10.9 -5.65,-10.858 -5.618,-10.819 -2.368,-7.569 -2.203,-7.371 -2.085,-7.153 -2.015,-6.916 -1.991,-6.66 v1(-1.991,-6.009)
  Top Layer w0.15: U1_MOTOR3.15@-3.3,-3.359 -3.28,-3.359 -3.273,-3.359 -3.266,-3.357 -3.259,-3.353 -3.253,-3.348 -3.043,-3.138 -3.023,-3.121 -3,-3.109 -2.975,-3.101 -2.948,-3.099 -2.91,-3.099 -2.896,-3.1 -2.882,-3.104 -2.869,-3.111 -2.858,-3.121 v1(-2.572,-3.406)
  Bottom Layer w0.125: v1(-2.572,-3.406) -2.572,-5.058 -2.556,-5.236 -2.507,-5.401 -2.425,-5.552 -2.311,-5.689 v1(-1.991,-6.009)
  Bottom Layer w0.15: R8_MOTOR3.1@-7.846,-13.346 -7.479,-12.979 -7.459,-12.963 -7.437,-12.951 -7.413,-12.943 -7.387,-12.941 -7.351,-12.941 -7.336,-12.94 -7.323,-12.936 -7.311,-12.929 -7.3,-12.92 v1(-7.263,-12.884)
GHC_MOTOR4: R8_MOTOR4.1 U1_MOTOR4.15 | length 14.2
  Top Layer w0.125: v1(-13,7) -12.78,6.78 -12.685,6.701 -12.581,6.645 -12.468,6.611 -12.345,6.6 -12.073,6.6 -11.965,6.59 -11.866,6.561 -11.775,6.511 -11.692,6.442 v1(-11.5,6.25)
  Top Layer w0.15: U1_MOTOR4.15@-3.197,3.492 -2.893,3.188 -2.852,3.14 -2.823,3.086 -2.806,3.028 -2.8,2.965 -2.8,2.805 -2.802,2.785 -2.807,2.766 -2.816,2.749 -2.829,2.734 -2.865,2.698 -2.876,2.684 -2.885,2.67 -2.889,2.653 -2.891,2.636 v1(-2.891,2.591)
  Bottom Layer w0.125: R8_MOTOR4.1@-13.416,7.516 -13.416,7.461 -13.414,7.44 -13.408,7.42 -13.398,7.401 -13.384,7.384 v1(-13,7) ; v1(-11.5,6.25) -11.472,6.25 -11.462,6.249 -11.452,6.246 -11.442,6.241 -11.434,6.234 -7.798,2.598 -7.426,2.289 -7.018,2.068 -6.573,1.935 -6.091,1.891 -3.751,1.891 -3.608,1.904 -3.476,1.943 -3.356,2.009 -3.245,2.1 -3.005,2.341 -2.998,2.349 -2.993,2.358 -2.991,2.367 -2.99,2.378 -2.99,2.393 -2.989,2.398 -2.987,2.404 -2.985,2.408 -2.981,2.413 -2.919,2.475 -2.907,2.49 -2.898,2.506 -2.893,2.524 -2.891,2.543 v1(-2.891,2.591)
GHCG_MOTOR1: Q5_MOTOR1.3 R8_MOTOR1.2 | length 3.8
  Bottom Layer w0.125: R8_MOTOR1.2@13.896,-7.156 14.111,-7.371 14.133,-7.39 14.157,-7.403 14.184,-7.411 14.213,-7.413 14.253,-7.413 14.268,-7.415 14.283,-7.419 14.296,-7.426 14.308,-7.437 14.336,-7.464 14.346,-7.476 14.353,-7.489 14.357,-7.503 14.359,-7.519 14.359,-7.746 14.368,-7.848 14.396,-7.943 14.443,-8.03 14.509,-8.109 15.275,-8.875 15.407,-9.033 15.501,-9.208 15.558,-9.398 15.577,-9.604 15.577,-10.126 15.578,-10.145 15.584,-10.163 15.592,-10.179 15.605,-10.194 v1(15.639,-10.228)
GHCG_MOTOR2: Q5_MOTOR2.3 R8_MOTOR2.2 | length 0.9
  Bottom Layer w0.125: R8_MOTOR2.2@8.063,14.145 v1@8.725,14.808 ; v1(8.727,14.812) v1(8.727,14.812)
GHCG_MOTOR3: Q5_MOTOR3.3 R8_MOTOR3.2 | length 0.9
  Bottom Layer w0.15: v1(-8.907,-14.783) -8.907,-14.577 -8.9,-14.495 -8.878,-14.42 -8.84,-14.351 -8.788,-14.288 R8_MOTOR3.2@-8.554,-14.054
GHCG_MOTOR4: Q5_MOTOR4.3 R8_MOTOR4.2 | length 1
  Bottom Layer w0.125: v1(-14.861,8.946) -14.853,8.946 -14.85,8.946 -14.847,8.945 -14.844,8.944 -14.842,8.942 R8_MOTOR4.2@-14.145,8.245
GLA_MOTOR1: R3_MOTOR1.1 U1_MOTOR1.8 | length 17.3
  Top Layer w0.125: v1(-2.491,-15.909) -2.529,-15.909 -2.543,-15.908 -2.557,-15.904 -2.57,-15.897 -2.581,-15.887 -2.875,-15.593 -2.988,-15.458 -3.069,-15.309 -3.117,-15.146 -3.133,-14.97 -3.133,-14.232 -3.121,-14.097 -3.083,-13.972 -3.021,-13.857 -2.934,-13.752 -2.8,-13.618 -2.743,-13.571 -2.68,-13.536 -2.611,-13.516 -2.536,-13.509 -2.236,-13.509 -2.118,-13.52 -2.009,-13.552 -1.909,-13.607 -1.817,-13.682 -1.513,-13.987 -1.504,-13.994 -1.494,-14 -1.484,-14.003 -1.472,-14.004 -1.456,-14.004 -1.45,-14.003 -1.444,-14.001 -1.439,-13.999 -1.434,-13.995 U1_MOTOR1.8@-1.291,-13.851
  Bottom Layer w0.125: v1(-2.491,-15.909) -1.726,-16.674 -1.397,-16.948 -1.035,-17.144 -0.641,-17.261 -0.215,-17.3 2.5,-17.3 2.982,-17.256 3.427,-17.123 3.835,-16.902 4.207,-16.593 6.569,-14.231 6.765,-14.068 6.98,-13.952 7.215,-13.882 7.469,-13.858 7.924,-13.858 8.015,-13.867 8.099,-13.892 8.176,-13.934 8.246,-13.992 8.363,-14.109 8.388,-14.129 8.415,-14.144 8.444,-14.153 8.475,-14.155 R3_MOTOR1.1@8.555,-14.155
GLA_MOTOR2: R3_MOTOR2.1 U1_MOTOR2.8 | length 7.9
  Top Layer w0.125: U1_MOTOR2.8@9.26,5.987 9.279,5.987 9.287,5.986 9.294,5.984 9.3,5.981 9.306,5.976 9.5,5.782 9.583,5.713 9.674,5.664 9.774,5.634 9.881,5.624 10.21,5.624 11.56,5.624 11.863,5.652 12.144,5.736 12.401,5.875 12.636,6.07 13.172,6.606 13.176,6.611 13.178,6.615 13.18,6.62 13.18,6.626 13.18,6.634 13.18,6.637 13.181,6.64 13.183,6.642 13.185,6.645 13.274,6.734 13.286,6.749 13.295,6.765 13.3,6.783 13.302,6.802 v1(13.302,6.85)
  Bottom Layer w0.125: v1(13.302,6.85) 13.336,6.884 13.351,6.896 13.367,6.905 13.385,6.91 13.404,6.912 13.464,6.912 13.487,6.914 13.509,6.921 13.529,6.932 13.547,6.947 14.626,8.026 14.722,8.142 14.791,8.269 14.833,8.408 14.846,8.558 14.846,8.932 14.846,8.936 14.845,8.939 14.843,8.942 14.841,8.945 14.835,8.952 14.831,8.957 14.828,8.962 14.826,8.968 14.825,8.975 14.825,9.312 14.826,9.318 14.828,9.324 14.831,9.33 14.835,9.335 R3_MOTOR2.1@14.846,9.346
GLA_MOTOR3: R3_MOTOR3.1 U1_MOTOR3.8 | length 9.5
  Top Layer w0.125: v1(-5.291,-6.409) U1_MOTOR3.8@-5,-6.118 ; U1_MOTOR3.8@-4.997,-6.117 U1_MOTOR3.8@-4.997,-6.117
  Bottom Layer w0.125: R3_MOTOR3.1@-12.745,-8.298 -12.684,-8.298 -12.66,-8.296 -12.638,-8.289 -12.618,-8.278 -12.599,-8.263 -12.18,-7.843 -11.999,-7.693 -11.801,-7.586 -11.585,-7.521 -11.351,-7.5 -8.751,-7.5 -8.534,-7.52 -8.333,-7.58 -8.149,-7.679 -7.981,-7.819 -7.766,-8.034 -7.674,-8.11 -7.573,-8.165 -7.462,-8.198 -7.343,-8.209 -6.709,-8.209 -6.46,-8.186 -6.229,-8.117 -6.017,-8.003 -5.824,-7.842 -5.535,-7.553 -5.431,-7.428 -5.357,-7.291 -5.312,-7.142 -5.298,-6.98 -5.298,-6.42 -5.297,-6.418 -5.297,-6.416 -5.296,-6.414 -5.295,-6.413 v1(-5.291,-6.409)
GLA_MOTOR4: R3_MOTOR4.1 U1_MOTOR4.8 | length 7.6
  Top Layer w0.15: v1(-6.697,5.578) -6.16,5.041 -6.155,5.037 -6.148,5.033 -6.141,5.031 -6.133,5.03 -6.123,5.03 -6.118,5.031 -6.114,5.032 -6.111,5.034 -6.108,5.036 U1_MOTOR4.8@-5.955,5.189
  Bottom Layer w0.125: R3_MOTOR4.1@-6.746,10.946 -6.746,10.856 -6.743,10.821 -6.733,10.788 -6.717,10.758 -6.694,10.731 -6.587,10.624 -6.549,10.578 -6.522,10.527 -6.505,10.472 -6.5,10.413 -6.5,9.383 -6.535,8.997 -6.642,8.641 -6.819,8.314 -7.066,8.016 -7.758,7.324 -7.82,7.249 -7.865,7.167 -7.891,7.078 -7.9,6.982 -7.9,6.737 -7.884,6.562 -7.836,6.4 -7.755,6.251 -7.643,6.116 -7.365,5.838 -7.31,5.792 -7.25,5.76 -7.184,5.74 -7.113,5.734 -7.014,5.734 -6.975,5.73 -6.939,5.719 -6.906,5.701 -6.876,5.676 -6.803,5.604 -6.79,5.593 -6.775,5.585 -6.759,5.58 -6.741,5.578 v1(-6.697,5.578)
GLAG_MOTOR1: Q2_MOTOR1.3 R3_MOTOR1.2 | length 1.3
  Bottom Layer w0.15: R3_MOTOR1.2@9.263,-14.863 9.482,-15.082 9.549,-15.137 9.622,-15.177 9.702,-15.201 9.789,-15.209 9.91,-15.209 9.958,-15.213 10.002,-15.226 10.042,-15.248 10.079,-15.279 10.321,-15.521 10.326,-15.526 10.332,-15.529 10.339,-15.531 10.346,-15.531 v1(10.364,-15.531)
GLAG_MOTOR2: Q2_MOTOR2.3 R3_MOTOR2.2 | length 2
  Bottom Layer w0.125: v1(13.706,9.773) 13.741,9.807 13.755,9.82 13.771,9.828 13.789,9.834 13.808,9.835 13.878,9.835 13.906,9.838 13.931,9.845 13.955,9.858 13.976,9.876 14.074,9.974 14.116,10.009 14.162,10.034 14.212,10.049 14.267,10.054 15.133,10.054 15.14,10.053 15.146,10.051 15.151,10.048 15.157,10.044 15.163,10.038 15.166,10.035 15.169,10.034 15.172,10.033 15.176,10.032 15.519,10.032 15.525,10.033 15.531,10.035 15.537,10.038 15.542,10.042 R3_MOTOR2.2@15.554,10.054
GLAG_MOTOR3: Q2_MOTOR3.3 R3_MOTOR3.2 | length 1
  Bottom Layer w0.15: v1(-14.1,-9.7) -14.1,-9.674 -14.099,-9.664 -14.096,-9.654 -14.092,-9.646 -14.085,-9.638 R3_MOTOR3.2@-13.453,-9.005
GLAG_MOTOR4: Q2_MOTOR4.3 R3_MOTOR4.2 | length 3.9
  Top Layer w0.125: Q2_MOTOR4.3@-9.734,14.073 -9.734,14.064 -9.734,14.06 -9.735,14.057 -9.737,14.054 -9.739,14.051 -9.879,13.911 -9.909,13.875 -9.931,13.835 -9.944,13.792 -9.948,13.745 -9.948,13.626 -9.94,13.54 -9.917,13.461 -9.878,13.389 -9.823,13.323 -8.997,12.497 -8.881,12.4 -8.81,12.362 -8.781,12.347 -8.751,12.334 -8.721,12.322 -8.69,12.312 -8.253,12.184 -8.119,12.135 -7.994,12.072 -7.878,11.993 -7.772,11.898 -7.522,11.649 ccw(c-7.404,11.767) v1@-7.404,11.6
  other v1: -7.4,11.6
GLB_MOTOR1: R7_MOTOR1.1 U1_MOTOR1.12 | length 17.5
  Top Layer w0.125: U1_MOTOR1.12@-0.159,-14.983 -0.801,-15.624 -0.818,-15.644 -0.83,-15.666 -0.837,-15.69 -0.839,-15.716 -0.839,-15.782 -0.843,-15.83 -0.856,-15.873 -0.878,-15.913 -0.908,-15.95 -1.073,-16.114 -1.124,-16.176 -1.161,-16.244 -1.184,-16.319 -1.191,-16.4 -1.191,-16.604 -1.178,-16.751 -1.137,-16.887 -1.07,-17.011 -0.976,-17.124 -0.596,-17.504 -0.432,-17.64 -0.253,-17.737 -0.057,-17.796 0.155,-17.815 1.385,-17.815 1.867,-17.771 2.312,-17.638 2.72,-17.417 3.092,-17.108 9.719,-10.481 9.839,-10.381 9.971,-10.31 10.116,-10.267 10.272,-10.252 v1(10.668,-10.252)
  other v1: -0.897,-15.938
GLB_MOTOR2: R7_MOTOR2.1 U1_MOTOR2.12 | length 5.3
  Top Layer w0.15: U1_MOTOR2.12@7.969,6.959 8.438,7.428 8.606,7.63 8.726,7.851 8.798,8.093 8.822,8.354 8.822,8.954 8.838,9.131 8.887,9.295 8.968,9.445 9.082,9.582 v1(9.4,9.9)
  Bottom Layer w0.15: R7_MOTOR2.1@9.155,11.637 9.155,11.551 9.159,11.517 9.168,11.485 9.184,11.456 9.206,11.43 9.312,11.323 9.351,11.277 9.378,11.226 9.395,11.171 9.4,11.112 9.4,10.238 ; v1@9.399,9.901 9.399,10.237
GLB_MOTOR3: R7_MOTOR3.1 U1_MOTOR3.12 | length 9.1
  Top Layer w0.125: R7_MOTOR3.1@-7.137,-10.855 -7.137,-10.608 -7.14,-10.58 -7.148,-10.553 -7.161,-10.528 -7.18,-10.506 -7.232,-10.454 -7.258,-10.423 -7.276,-10.389 -7.287,-10.351 -7.291,-10.311 -7.291,-10.255 -7.289,-10.233 -7.283,-10.212 -7.273,-10.194 -7.258,-10.176 -6.268,-9.186 -6.017,-8.977 -5.742,-8.828 -5.441,-8.739 -5.116,-8.709 -4.662,-8.709 -4.483,-8.693 -4.318,-8.643 -4.167,-8.561 -4.028,-8.446 -2.829,-7.247 -2.725,-7.122 -2.651,-6.984 -2.606,-6.834 -2.591,-6.672 -2.591,-6.445 -2.599,-6.356 -2.624,-6.274 -2.665,-6.198 -2.722,-6.129 U1_MOTOR3.12@-3.865,-4.986
GLB_MOTOR4: R7_MOTOR4.1 U1_MOTOR4.12 | length 8.9
  Top Layer w0.15: v1(-5.561,3.103) -5.529,3.134 -5.518,3.148 -5.51,3.163 -5.505,3.179 -5.503,3.197 -5.503,3.296 -5.5,3.336 -5.489,3.372 -5.471,3.405 -5.446,3.436 U1_MOTOR4.12@-4.823,4.058
  Bottom Layer w0.125: R7_MOTOR4.1@-11.046,7.046 -11.046,6.956 -11.043,6.921 -11.033,6.888 -11.017,6.858 -10.994,6.831 -10.541,6.378 -10.523,6.356 -10.51,6.332 -10.503,6.306 -10.5,6.278 -10.5,6.206 -10.495,6.155 -10.481,6.108 -10.458,6.064 -10.425,6.025 -7.274,2.874 -7.125,2.75 -6.962,2.662 -6.783,2.609 -6.59,2.591 -6.321,2.591 -6.215,2.601 -6.116,2.63 -6.026,2.679 -5.944,2.747 -5.597,3.094 -5.593,3.098 -5.588,3.101 -5.582,3.102 -5.576,3.103 v1(-5.561,3.103)
GLBG_MOTOR1: Q4_MOTOR1.3 R7_MOTOR1.2 | length 2.5
  Bottom Layer w0.125: R7_MOTOR1.2@11.634,-10.824 11.738,-10.824 11.779,-10.827 11.817,-10.839 11.852,-10.858 11.884,-10.884 12.047,-11.047 12.117,-11.105 12.193,-11.146 12.277,-11.171 12.368,-11.18 12.539,-11.18 12.607,-11.186 12.669,-11.204 12.727,-11.235 12.779,-11.279 v1(13.609,-12.109)
GLBG_MOTOR2: Q4_MOTOR2.3 R7_MOTOR2.2 | length 1.9
  Top Layer w0.125: v1(9.531,12.89) 9.794,13.153 9.857,13.205 9.925,13.242 9.999,13.264 10.08,13.271 10.192,13.271 10.236,13.267 10.277,13.255 10.314,13.235 10.349,13.206 10.464,13.091 10.472,13.084 10.482,13.079 10.492,13.076 10.503,13.075 Q4_MOTOR2.3@10.532,13.075
  Bottom Layer w0.125: v1(9.531,12.89) 9.795,12.626 9.824,12.59 9.846,12.551 9.858,12.508 9.863,12.462 R7_MOTOR2.2@9.863,12.345
GLBG_MOTOR3: Q4_MOTOR3.3 R7_MOTOR3.2 | length 3.6
  Top Layer w0.125: Q4_MOTOR3.3@-10.713,-13.046 -10.68,-13.046 -10.667,-13.047 -10.656,-13.051 -10.645,-13.057 -10.635,-13.065 -10.515,-13.185 -10.463,-13.229 -10.406,-13.259 -10.344,-13.278 -10.277,-13.284 -10.161,-13.284 -10.115,-13.28 -10.073,-13.267 -10.035,-13.246 -10,-13.217 -8.78,-11.998 -8.707,-11.937 -8.627,-11.893 -8.539,-11.867 -8.445,-11.859 -8.313,-11.859 -8.261,-11.854 -8.213,-11.84 -8.169,-11.816 -8.129,-11.782 -7.929,-11.583 -7.918,-11.574 -7.907,-11.568 -7.894,-11.564 -7.88,-11.563 R7_MOTOR3.2@-7.845,-11.563
GLBG_MOTOR4: Q4_MOTOR4.3 R7_MOTOR4.2 | length 3.8
  Top Layer w0.125: Q4_MOTOR4.3@-13.093,10.714 -13.352,10.455 -13.369,10.434 -13.381,10.412 -13.389,10.387 -13.391,10.36 -13.391,10.292 -13.387,10.243 -13.373,10.198 -13.351,10.157 -13.319,10.119 -12.241,9.041 -12.162,8.947 -12.107,8.844 -12.073,8.731 -12.062,8.61 -12.062,8.302 -12.06,8.283 -12.055,8.265 -12.046,8.249 -12.034,8.234 v1(-12,8.2)
  Bottom Layer w0.125: v1(-12,8.2) -11.717,7.917 -11.689,7.884 -11.669,7.847 -11.658,7.807 -11.654,7.764 R7_MOTOR4.2@-11.654,7.654
GLC_MOTOR1: R12_MOTOR1.1 U1_MOTOR1.16 | length 15.5
  Top Layer w0.15: U1_MOTOR1.16@1.75,-15.265 2.231,-15.747 2.349,-15.845 2.478,-15.915 2.62,-15.957 2.772,-15.971 v1(3.16,-15.971)
  Bottom Layer w0.125: v1(3.16,-15.971) 3.194,-15.937 3.206,-15.922 3.215,-15.906 3.22,-15.888 3.222,-15.869 3.222,-15.787 3.225,-15.755 3.234,-15.725 3.249,-15.697 3.27,-15.672 12.354,-6.588 12.397,-6.552 12.444,-6.527 12.496,-6.511 12.552,-6.506 12.63,-6.506 12.661,-6.503 12.689,-6.495 12.715,-6.481 12.739,-6.461 R12_MOTOR1.1@12.9,-6.3
GLC_MOTOR2: R12_MOTOR2.1 U1_MOTOR2.16 | length 8.5
  Top Layer w0.15: v1(5.2,15.5) 5.2,11.391 5.208,11.299 5.234,11.214 5.276,11.136 5.335,11.065 5.426,10.974 5.458,10.935 5.481,10.892 5.495,10.846 5.5,10.795 5.5,8.159 5.516,7.987 5.563,7.828 5.642,7.683 5.752,7.55 U1_MOTOR2.16@6.06,7.242
GLC_MOTOR3: R12_MOTOR3.1 U1_MOTOR3.16 | length 15.9
  Top Layer w0.125: U1_MOTOR3.16@-3.583,-3.076 -3.159,-2.653 -3.098,-2.602 -3.03,-2.566 -2.957,-2.544 -2.878,-2.537 -2.767,-2.537 -2.723,-2.541 -2.683,-2.553 -2.646,-2.573 -2.612,-2.601 -1.953,-3.259 -1.919,-3.301 -1.894,-3.347 -1.879,-3.397 -1.874,-3.451 -1.874,-3.588 -1.873,-3.597 -1.871,-3.606 -1.866,-3.615 -1.86,-3.622 v1(-1.842,-3.64)
  Bottom Layer w0.125: -4.366,-12.584 -4.105,-12.323 -4.011,-12.21 -3.944,-12.087 -3.904,-11.952 -3.891,-11.807 -3.891,-10.873 -3.857,-10.505 -3.756,-10.165 -3.587,-9.853 -3.351,-9.569 -2.098,-8.316 -1.789,-7.944 -1.568,-7.536 -1.435,-7.091 -1.391,-6.609 -1.391,-5.181 -1.399,-5.098 -1.421,-5.022 -1.459,-4.951 -1.512,-4.888 -1.661,-4.739 -1.757,-4.623 -1.826,-4.495 -1.868,-4.356 -1.882,-4.206 -1.882,-3.705 -1.881,-3.693 -1.877,-3.681 -1.872,-3.671 -1.864,-3.662 v1(-1.842,-3.64)
  Bottom Layer w0.15: R12_MOTOR3.1@-5.896,-15.271 -5.595,-14.97 -5.488,-14.841 -5.411,-14.698 -5.364,-14.543 -5.349,-14.376 -5.349,-13.931 -5.333,-13.756 -5.285,-13.594 -5.204,-13.445 -5.092,-13.31 -4.816,-13.034 -4.704,-12.922 -4.591,-12.809 -4.478,-12.696 -4.366,-12.584
GLC_MOTOR4: R12_MOTOR4.1 U1_MOTOR4.16 | length 19.2
  Top Layer w0.125: R12_MOTOR4.1@-15.846,5.546 -15.846,5.456 -15.843,5.421 -15.833,5.388 -15.817,5.358 -15.794,5.331 -15.37,4.906 -15.187,4.754 -14.986,4.645 -14.767,4.58 -14.531,4.558 -13.54,4.558 -13.457,4.566 -13.379,4.589 -13.308,4.628 -13.244,4.681 -13.161,4.764 -13.125,4.794 -13.086,4.815 -13.044,4.827 -12.998,4.832 v1(-11.498,4.832)
  Top Layer w0.15: U1_MOTOR4.16@-2.914,3.775 -1.746,2.607 -1.715,2.569 -1.692,2.528 -1.679,2.483 -1.675,2.434 -1.675,2.311 -1.673,2.293 -1.668,2.277 -1.66,2.262 -1.649,2.249 v1(-1.617,2.217)
  Bottom Layer w0.125: v1(-11.498,4.832) -11.498,4.785 -11.496,4.767 -11.491,4.75 -11.482,4.735 -11.471,4.721 -8.216,1.466 -7.844,1.156 -7.435,0.935 -6.99,0.803 -6.508,0.758 -3.414,0.758 -3.082,0.789 -2.774,0.881 -2.492,1.033 -2.235,1.247 -1.75,1.732 -1.701,1.791 -1.666,1.856 -1.645,1.926 -1.638,2.003 -1.638,2.183 -1.637,2.19 -1.635,2.195 -1.633,2.201 -1.628,2.206 v1(-1.617,2.217)
GLCG_MOTOR1: Q6_MOTOR1.3 R12_MOTOR1.2 | length 5.4
  Top Layer w0.125: v1(14.5,-6.15) 14.504,-6.155 14.506,-6.156 14.508,-6.158 14.511,-6.158 14.513,-6.158 15.772,-6.158 15.99,-6.179 16.191,-6.239 16.376,-6.339 16.544,-6.479 16.759,-6.694 16.836,-6.786 16.891,-6.888 16.924,-6.999 16.935,-7.119 16.935,-8.542 16.938,-8.569 16.946,-8.594 16.958,-8.618 16.976,-8.639 17.003,-8.666 17.012,-8.677 17.019,-8.69 17.023,-8.704 17.025,-8.719 Q6_MOTOR1.3@17.025,-8.882
  Bottom Layer w0.125: R12_MOTOR1.2@13.9,-6.3 13.982,-6.218 14.018,-6.188 14.056,-6.167 14.099,-6.155 14.145,-6.15 v1(14.5,-6.15)
GLCG_MOTOR2: Q6_MOTOR2.3 R12_MOTOR2.2 | length 1.7
  Top Layer w0.125: v1(6.5,17.1) 6.504,17.1 6.505,17.1 6.507,17.099 6.508,17.099 6.509,17.098 Q6_MOTOR2.3@7.173,16.434
  Bottom Layer w0.125: R12_MOTOR2.2@5.963,16.545 6.494,17.076 6.497,17.079 6.499,17.083 6.5,17.086 6.5,17.09 v1(6.5,17.1)
GLCG_MOTOR3: Q6_MOTOR3.3 R12_MOTOR3.2 | length 2.1
  Top Layer w0.15: Q6_MOTOR3.3@-7.354,-16.405 -7.096,-16.663 -7.019,-16.727 -6.935,-16.772 -6.843,-16.8 -6.743,-16.809 v1@-6.491,-16.809
  Bottom Layer w0.15: R12_MOTOR3.2@-6.604,-15.979 -6.615,-15.99 -6.619,-15.995 -6.622,-16.001 -6.624,-16.007 -6.625,-16.013 -6.625,-16.333 -6.624,-16.339 -6.622,-16.345 -6.619,-16.351 -6.615,-16.356 -6.609,-16.362 -6.606,-16.365 -6.605,-16.368 -6.604,-16.371 -6.604,-16.375 -6.604,-16.532 -6.598,-16.597 -6.58,-16.657 -6.55,-16.712 -6.508,-16.762 v1@-6.35,-16.92
  other v1: -6.35,-16.925
GLCG_MOTOR4: Q6_MOTOR4.3 R12_MOTOR4.2 | length 1.3
  Top Layer w0.125: R12_MOTOR4.2@-16.554,6.254 -16.554,6.49 -16.556,6.52 -16.565,6.548 -16.578,6.573 -16.598,6.597 -16.652,6.651 -16.687,6.693 -16.712,6.74 -16.727,6.79 -16.732,6.845 -16.732,6.971 -16.728,7.021 -16.714,7.067 -16.691,7.109 -16.659,7.147 Q6_MOTOR4.3@-16.452,7.355